# Altium PCB EVB-2.PCBDOC (part 3 of 6)
Units mil, origin at the board's own origin, x right, y up, seen from the top; angles counter-clockwise.
Board outline 2401.57 x 1771.65 mil, 6 copper layers (Top, Mid1-H, Mid2-PWR, GND, Mid3-V, Bottom), stack 59.449 mil thick; 172 components, 166 nets, 823 pads, 550 vias.
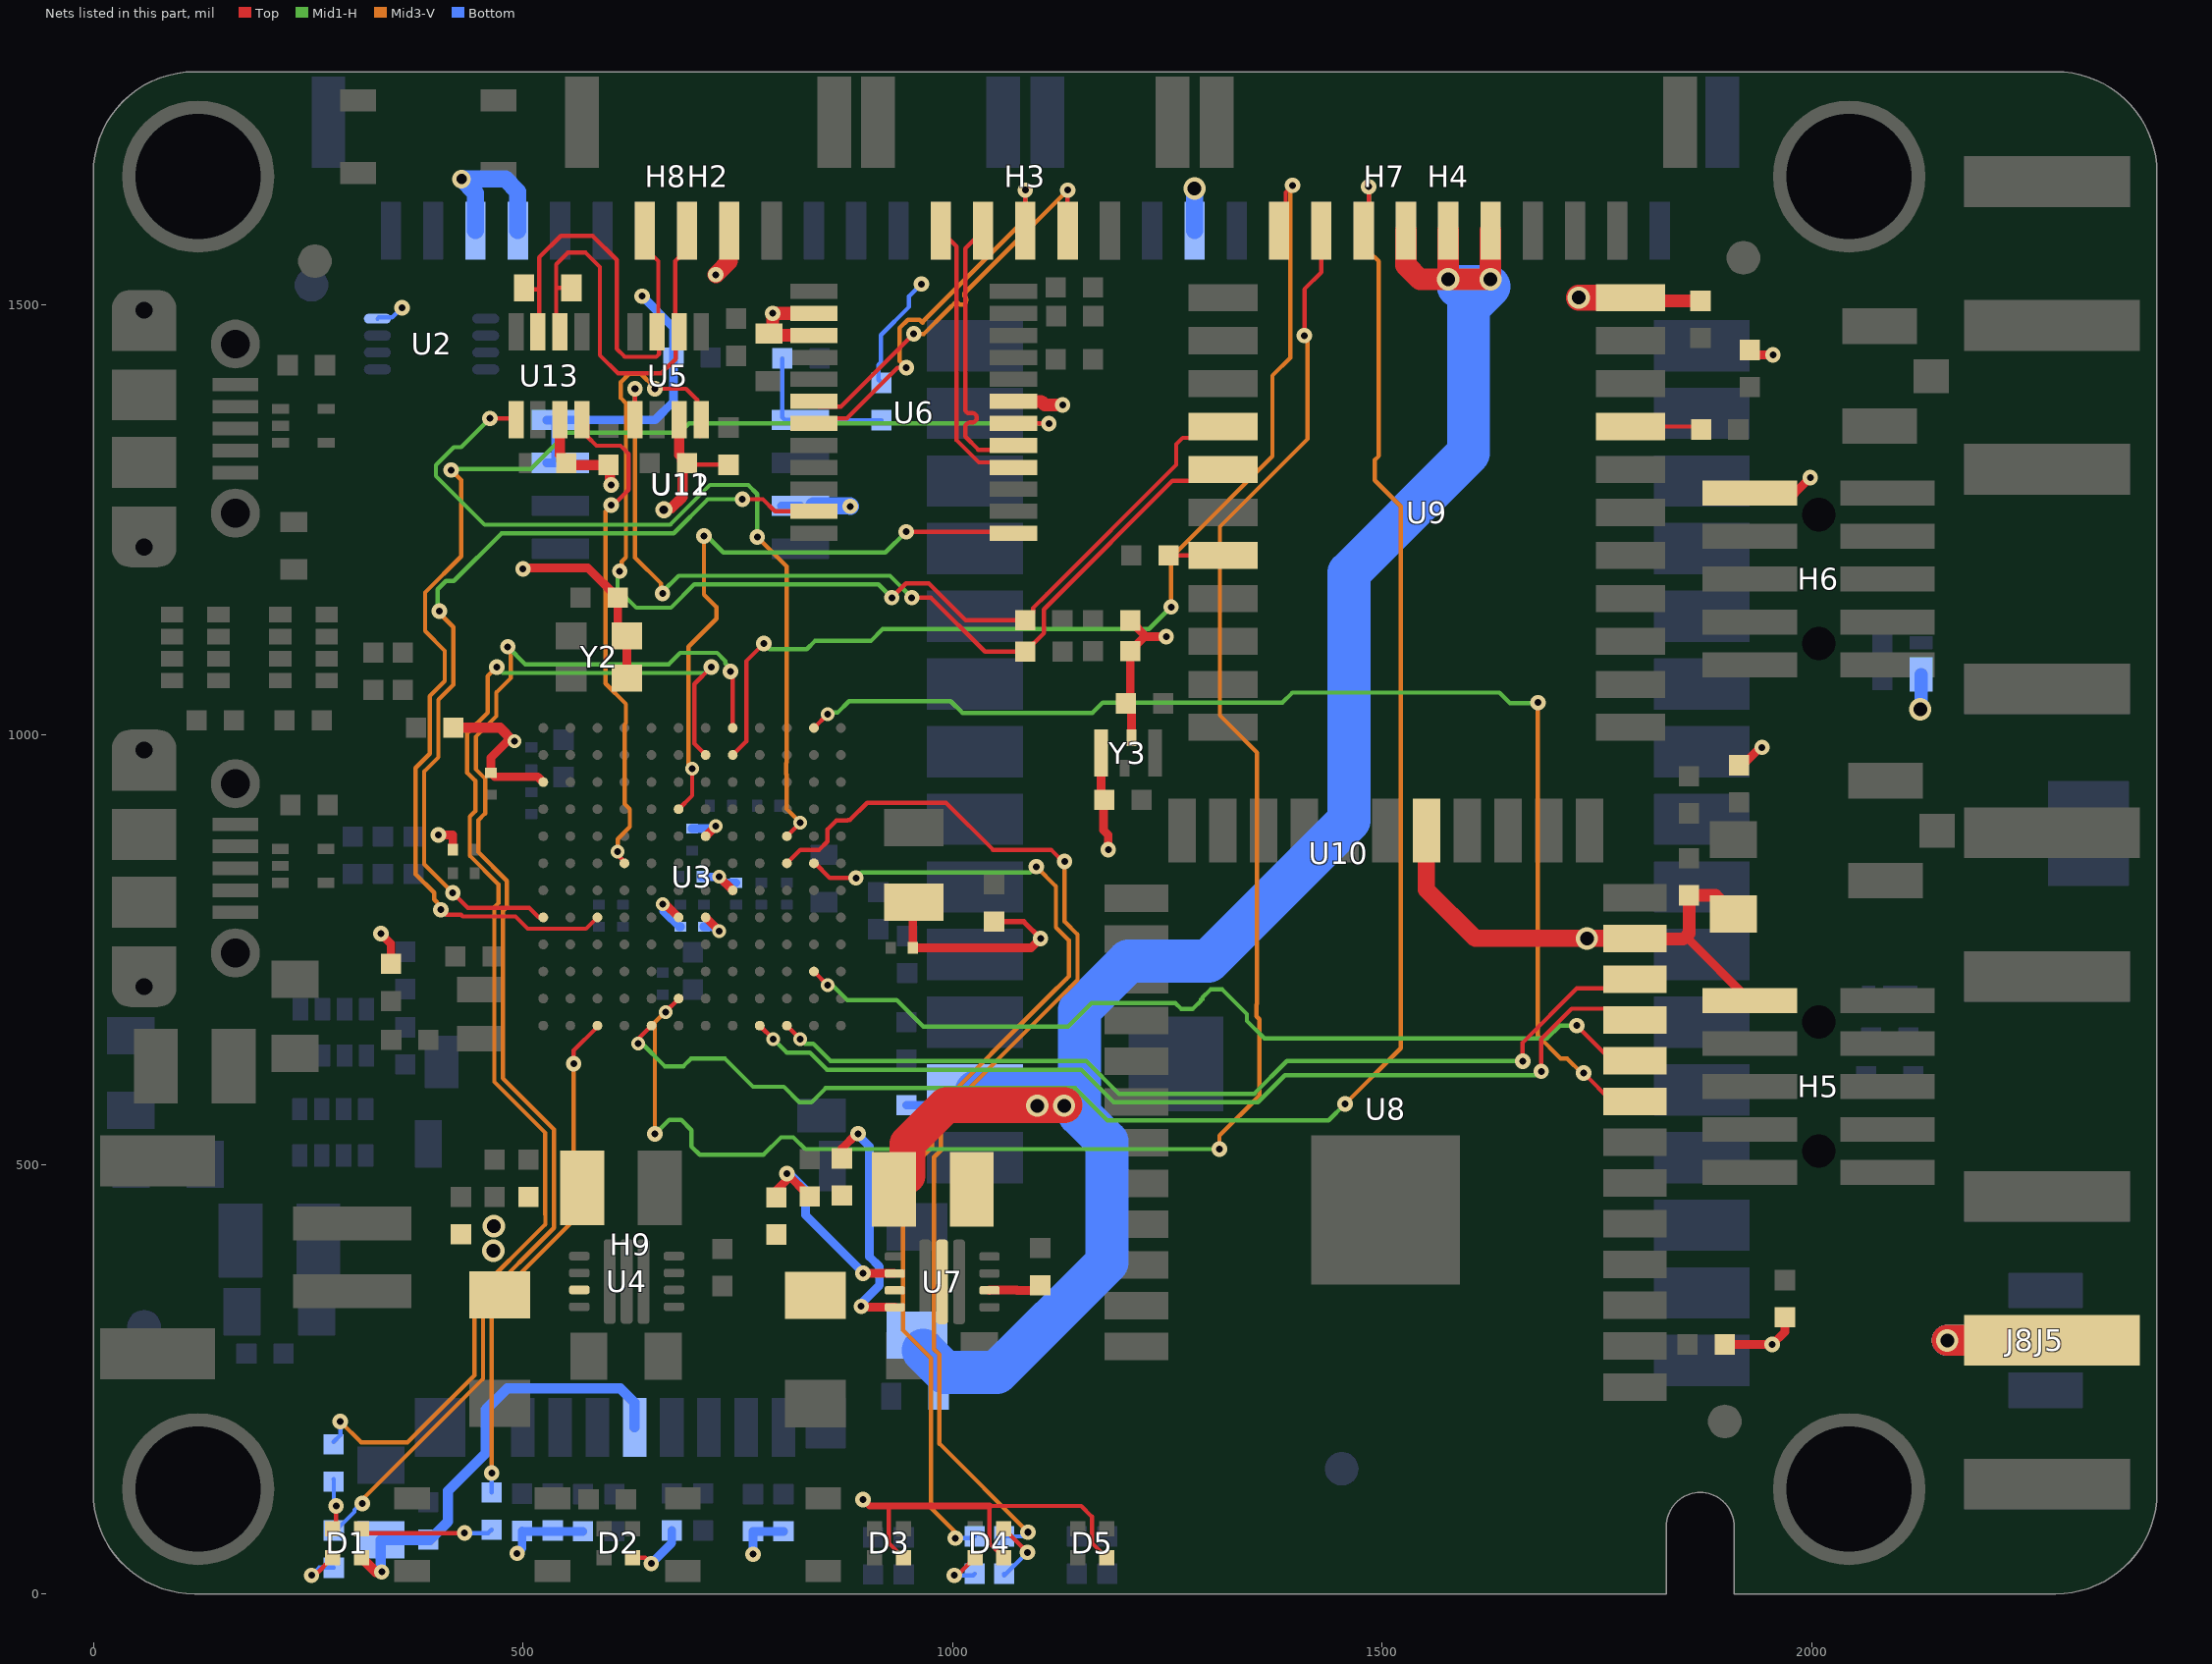
[diagram p6: the nets of this part, all layers, seen from the top]

## Part data (continued)
J3 J4 J8: "CONN UMC RCPT STR 50 OHM SMD", Dielectric Material=-, Frequency - Max=6GHz, Housing Color=Gold, Manufacturer="Emerson Network Power Connectivity Johnson", Manufacturer Part Number=128-0711-201, Operating Temperature="-40°C ~ 90°C", Supplier Part Number 1=J983CT-ND, Voltage Rating=200V, Body Finish=Gold, Body Material=-, Cable Group=-, Category="Connectors, Interconnects", Center Contact Material=-, Center Contact Plating=Gold, ComponentLink1Description=http://media.digikey.com/pdf/Data%20Sheets/Emerson%20PDFs/UMC%20Product%20Catalog.pdf, ComponentLink1URL=http://media.digikey.com/pdf/Data%20Sheets/Emerson%20PDFs/UMC%20Product%20Catalog.pdf, Connector Style="Ultra Miniature Coaxial", Connector Type="Receptacle, Male Pins", Contact Termination=Solder, Fastening Type=Snap-On, Features=-, Impedance="50 Ohm", Ingress Protection=-, Mounting Type="Surface Mount", Packaging="Cut Tape (CT)", Pricing 1="1=0.93, 10=0.832, 50=0.784, 100=0.672, 250=0.576, 500=0.544, 750=0.48, 1000=0.448 (USD)", RoHS="RoHS Compliant", Shield Termination=Solder, Stock 1=1514, Supplier 1=Digi-Key
J5: "CONN RPSMA JCK STR 50OHM EDGEMNT", Case/Package=SMA, Dielectric Material=PTFE, Frequency=18GHz, Housing Colour=Gold, Manufacturer="Amphenol Connex", Manufacturer Part Number=132255RP, Max Operating Temperature=165°C, Min Operating Temperature=-65°C, Package Quantity=1, Supplier Part Number 1=ACX1425-ND, Voltage Rating=375V, Board Thickness=0.062inch, Body Material=Brass, Body Plating=Gold, Connector Type="Coaxial,Male Pin,SMA", Contact Material=Copper, Contact Plating=Gold, Depth=7.92mm, Fastening Type=Threaded, Impedance=50R, Insulation Material=Polytetrafluoroethylene, Length=9.52mm, Mating Cycles=500, Max Frequency=18GHz, Mount=Edge,PCB, Orientation=Straight, Packaging=Bulk, Pricing 1="1=7.75, 10=7.429, 25=6.7832, 50=6.46, 100=6.137, 250=5.491, 500=5.168, 1000=4.522 (USD)", Radiation Hardening=No, REACH SVHC=Unknown, Stock 1=513, Supplier 1=Digi-Key, Termination=Solder, Weight=0.126986oz
J6 J7: "CONN SMA RCPT STR 50OHM EDGE MNT", Case/Package=SMA, Dielectric Material=PTFE, Housing Colour=Gold, Manufacturer=Molex, Manufacturer Part Number=0732511150, Max Frequency=18GHz, Max Operating Temperature=165°C, Min Operating Temperature=-65°C, Package Quantity=1600, Supplier Part Number 1=WM5534-ND, Voltage Rating=500V, Body Material=Brass, Body Plating=Gold, Connector Type=SMA,Socket, Contact Material=Copper, Contact Plating=Gold, Depth=9.53mm, Fastening Type=Threaded, Impedance=50R, Insulation Material=Polytetrafluoroethylene, Lead Free="Lead Free", Length=9.53mm, Mount=Edge, Packaging=Tray, Pricing 1="1=3.33, 10=3.193, 25=2.9272, 50=2.7942, 100=2.6612, 250=2.32856, 500=2.26202, 1600=1.86284, 3200=1.79631 (USD)", Radiation Hardening=No, Stock 1=22842, Supplier 1=Digi-Key, Termination=Solder
MP1 MP2 MP3 MP4: "RND STANDOFF M2.5X0.45 STEEL 5MM", Manufacturer="Wurth Electronics", Manufacturer Part Number=9774050951R, Supplier Part Number 1=732-7098-1-ND, Inside Diameter=0.106inch, Length=0.252inch, Material=Steel, Outside Diameter=0.201inch, Plating=Tin, Pricing 1="1=0.95, 10=0.918, 50=0.795, 100=0.739 (USD)", REACH SVHC=Unknown, Stock 1=2378, Supplier 1=Digi-Key, Threaded/Unthreaded=Unthreaded
Q1 Q2 Q5 Q6: library part MOSFET-Dual-P, "4V DRIVE PCH+PCH MOSFET", Continuous Drain Current (ID)=2.5A, Current Rating=-6A, Drain to Source Breakdown Voltage=-30V, Drain to Source Resistance=84mR, Drain to Source Voltage (Vdss)=30V, Gate to Source Voltage (Vgs)=20V, Manufacturer=Rohm, Manufacturer Part Number=TT8J3TR, Max Operating Temperature=150°C, Max Power Dissipation=1.25W, Min Operating Temperature=-55°C, On-State Resistance=64MR, Package Quantity=3000, Power Dissipation=1.1W, Supplier Part Number 1=TT8J3TRCT-ND, Threshold Voltage=-1.5V, Voltage Rating (DC)=-20V, Element Configuration=Dual, Height=1.1mm, Lead Free="Lead Free", Length=3.1mm, Nominal Vgs=-1.5V, Number of Elements=2, Number of Pins=8, Packaging="Tape and Reel", Pricing 1="1=0.59, 10=0.493, 100=0.3696, 500=0.27102, 1000=0.20942 (USD)", Radiation Hardening=No, Rds On Max=84mR, REACH SVHC="No SVHC", Rise Time=12ns, Stock 1=30988, Supplier 1=Digi-Key, Turn-Off Delay Time=32ns, Turn-On Delay Time=5.5ns, Weight=0.01lb, Width=1.7mm
R1 R2 R8 R14 R23 R38 R39 R44 R45 R48 R49: "RES SMD 100K OHM 1% 1/16W 0402", Case/Package=0402, Case Code (Metric)=1005, Manufacturer=Panasonic, Manufacturer Part Number=ERJ-2RKF1003X, Max Operating Temperature=155°C, Max Power Dissipation=100mW, Min Operating Temperature=-55°C, Package Quantity=1, Resistance=100kR, Supplier Part Number 1=P100KLDKR-ND, Temperature Coefficient=100ppm/°C, Tolerance=1%, Voltage Rating=50V, Case Code (Imperial)=0402, Composition="Thick Film", Contact Plating=Tin, Depth=0.5mm, Features="Automotive AEC-Q200", Height=0.35mm, Lead Free="Lead Free", Length=1mm, Military Standard=Not, Mount="Surface Mount", Number of Pins=2, Number of Terminations=2, Packaging="Tape and Reel", Power Rating=100mW, Pricing 1="1=0.1, 10=0.045, 100=0.0184, 1000=0.00826, 2500=0.00717, 5000=0.00593 (USD)", Radiation Hardening=No, REACH SVHC="No SVHC", Stock 1=6572, Supplier 1=Digi-Key, Termination=SMD/SMT, Voltage Rating (DC)=50V, Width=0.5mm
  R1 R2 R38 R39 R44 R45 R48 R49: ComponentLink1Description=http://www.seielect.com/Catalog/SEI-RMCF_RMCP.pdf, ComponentLink1URL=http://www.seielect.com/Catalog/SEI-RMCF_RMCP.pdf
  R8 R14: ComponentLink1Description=https://datasheet.ciiva.com/2453/pyu-r-int-thick-7-2453361.pdf, ComponentLink1URL=https://datasheet.ciiva.com/2453/pyu-r-int-thick-7-2453361.pdf, ComponentLink2Description=https://datasheet.ciiva.com/2453/pyu-r-int-thick-7-2453362.pdf, ComponentLink2URL=https://datasheet.ciiva.com/2453/pyu-r-int-thick-7-2453362.pdf, ComponentLink3Description=https://datasheet.ciiva.com/2453/pyu-r-int-thick-7-2453363.pdf, ComponentLink3URL=https://datasheet.ciiva.com/2453/pyu-r-int-thick-7-2453363.pdf, ComponentLink4Description=https://datasheet.ciiva.com/22747/1018594-22747509.pdf, ComponentLink4URL=https://datasheet.ciiva.com/22747/1018594-22747509.pdf, ComponentLink5Description=https://datasheet.ciiva.com/15189/getdatasheetpartid-323696-15189334.pdf, ComponentLink5URL=https://datasheet.ciiva.com/15189/getdatasheetpartid-323696-15189334.pdf, ComponentLink6Description=https://datasheet.ciiva.com/16740/pyu-rc0402-51-rohs-l-6-r-16740567.pdf, ComponentLink6URL=https://datasheet.ciiva.com/16740/pyu-rc0402-51-rohs-l-6-r-16740567.pdf, ComponentLink7Description=https://datasheet.ciiva.com/12667/pyu-rc0402-51-rohs-l-6-r-12667930.pdf, ComponentLink7URL=https://datasheet.ciiva.com/12667/pyu-rc0402-51-rohs-l-6-r-12667930.pdf, ComponentLink8Description=https://datasheet.ciiva.com/11819/0900766b80c66297-11819452.pdf, ComponentLink8URL=https://datasheet.ciiva.com/11819/0900766b80c66297-11819452.pdf
R3: "RES SMD 0 OHM JUMPER 1/10W 0603", Case/Package=0603, Case Code (Metric)=1608, Manufacturer=Yageo, Manufacturer Part Number=RC0603JR-070RL, Max Operating Temperature=155°C, Min Operating Temperature=-55°C, Package Quantity=5000, Power Rating=100mW, Resistance=0mR, Supplier Part Number 1=311-0.0GRDKR-ND, Temperature Coefficient=200ppm/°C, Tolerance=1%, Voltage Rating=50V, Case Code (Imperial)=0603, Composition="Thick Film", Contact Plating=Matte,Tin, Depth=0.8mm, Height=0.45mm, Lead Free="Lead Free", Length=1.6mm, Military Standard=Not, Number of Pins=2, Packaging="Tape and Reel", Pricing 1="1=0.1, 10=0.021, 25=0.0152, 50=0.0114, 100=0.0084, 250=0.00644, 500=0.00514, 1000=0.00379 (USD)", Radiation Hardening=No, REACH SVHC="No SVHC", Stock 1=7565242, Supplier 1=Digi-Key, Termination=SMD/SMT, Voltage Rating (DC)=50V, Width=0.8mm
R4: "RES SMD 5.62K OHM 1% 1/10W 0402", Case/Package=0402, Case Code (Metric)=1005, Manufacturer=Panasonic, Manufacturer Part Number=ERJ-2RKF5621X, Max Operating Temperature=155°C, Max Power Dissipation=100mW, Min Operating Temperature=-55°C, Package Quantity=1, Resistance=5.62kR, Supplier Part Number 1=P5.62KLDKR-ND, Temperature Coefficient=100ppm/°C, Tolerance=1%, Voltage Rating=50V, Case Code (Imperial)=0402, Composition="Thick Film", Contact Plating=Tin, Depth=0.5mm, Features="Automotive AEC-Q200", Height=0.016inch, Lead Free="Lead Free", Length=1mm, Military Standard=Not, Mount="Surface Mount", Number of Terminations=2, Packaging="Tape and Reel", Power Rating=100mW, Pricing 1="1=0.1, 10=0.045, 100=0.0184, 1000=0.00826, 2500=0.00717, 5000=0.00593 (USD)", Radiation Hardening=No, REACH SVHC="No SVHC", Stock 1=642946, Supplier 1=Digi-Key, Termination=SMD/SMT, Voltage Rating (DC)=50V, Width=0.02inch
R5 R9 R41 R43: "RES 10K OHM 1/16W 1% 0402 SMD", Case/Package=0402, Case Code (Metric)=1005, Manufacturer=Panasonic, Manufacturer Part Number=ERJ-2RKF1002X, Max Operating Temperature=155°C, Max Power Dissipation=100mW, Min Operating Temperature=-55°C, Package Quantity=1, Resistance=10kR, Supplier Part Number 1=P10.0KLDKR-ND, Temperature Coefficient=100ppm/°C, Tolerance=1%, Voltage Rating=50V, Case Code (Imperial)=0402, Composition="Thick Film", Contact Plating=Tin, Depth=0.5mm, Features="Automotive AEC-Q200", Height=0.35mm, Lead Free="Lead Free", Length=1mm, Military Standard=Not, Mount="Surface Mount", Number of Pins=2, Number of Terminations=2, Packaging="Tape and Reel", Power Rating=100mW, Pricing 1="1=0.1, 10=0.045, 100=0.0184, 1000=0.00826, 2500=0.00717, 5000=0.00593 (USD)", Radiation Hardening=No, REACH SVHC="No SVHC", Stock 1=28312782, Supplier 1=Digi-Key, Termination=SMD/SMT, Voltage Rating (DC)=50V, Width=0.02inch
  R5 R9: ComponentLink1Description=http://www.yageo.com/documents/recent/PYu-RC0402_51_RoHS_L_6.pdf, ComponentLink1URL=http://www.yageo.com/documents/recent/PYu-RC0402_51_RoHS_L_6.pdf, LatestRevisionDate=2-Dec-2009
  R41 R43: ComponentLink1Description=http://industrial.panasonic.com/www-cgi/jvcr13pz.cgi?E+PZ+3+AOA0002+ERJ2RKF1002X+7+WW, ComponentLink1URL=http://industrial.panasonic.com/www-cgi/jvcr13pz.cgi?E+PZ+3+AOA0002+ERJ2RKF1002X+7+WW
R6 R12: "RES SMD 560K OHM 1% 1/10W 0402", Case/Package=0402, Case Code (Metric)=1005, Manufacturer=Panasonic, Manufacturer Part Number=ERJ-2RKF5603X, Max Operating Temperature=155°C, Max Power Dissipation=100mW, Min Operating Temperature=-55°C, Package Quantity=1, Resistance=560kR, Supplier Part Number 1=P560KLDKR-ND, Temperature Coefficient=100ppm/°C, Tolerance=1%, Voltage Rating=50V, Case Code (Imperial)=0402, ComponentLink1Description=https://datasheet.ciiva.com/17204/aoa0000ce2-17204757.pdf, ComponentLink1URL=https://datasheet.ciiva.com/17204/aoa0000ce2-17204757.pdf, ComponentLink2Description=https://datasheet.ciiva.com/6075/aoa0000ce2-6075366.pdf, ComponentLink2URL=https://datasheet.ciiva.com/6075/aoa0000ce2-6075366.pdf, ComponentLink3Description=https://datasheet.ciiva.com/16771/70260748-16771559.pdf, ComponentLink3URL=https://datasheet.ciiva.com/16771/70260748-16771559.pdf, ComponentLink4Description=https://datasheet.ciiva.com/22687/1678782-22687463.pdf, ComponentLink4URL=https://datasheet.ciiva.com/22687/1678782-22687463.pdf, ComponentLink5Description=https://datasheet.ciiva.com/7710/aoa0000ce2-7710746.pdf, ComponentLink5URL=https://datasheet.ciiva.com/7710/aoa0000ce2-7710746.pdf, ComponentLink6Description=https://datasheet.ciiva.com/11821/0900766b80f80784-11821338.pdf, ComponentLink6URL=https://datasheet.ciiva.com/11821/0900766b80f80784-11821338.pdf, ComponentLink7Description=https://datasheet.ciiva.com/24026/aoa0000ce2-24026571.pdf, ComponentLink7URL=https://datasheet.ciiva.com/24026/aoa0000ce2-24026571.pdf, ComponentLink8Description=https://datasheet.ciiva.com/16758/70260748-16758700.pdf, ComponentLink8URL=https://datasheet.ciiva.com/16758/70260748-16758700.pdf, ComponentLink9Description=https://datasheet.ciiva.com/9181/aoa0000ce2-9181118.pdf, ComponentLink9URL=https://datasheet.ciiva.com/9181/aoa0000ce2-9181118.pdf, Composition="Thick Film", Contact Plating=Tin, Depth=0.5mm, Features="Automotive AEC-Q200", Height=0.35mm, Length=1mm, Military Standard=Not, Mount="Surface Mount", Number of Pins=2, Number of Terminations=2, Packaging="Tape and Reel", Power Rating=100mW, Pricing 1="1=0.1, 10=0.056, 100=0.0227, 1000=0.01021, 2500=0.00886, 5000=0.00732 (USD)", Radiation Hardening=No, REACH SVHC="No SVHC", Stock 1=227984, Supplier 1=Digi-Key, Termination=SMD/SMT, Voltage Rating (DC)=50V, Width=0.02inch
R7 R13: "RES SMD 150K OHM 1% 1/10W 0402", Case/Package=0402, Case Code (Metric)=1005, Manufacturer=Panasonic, Manufacturer Part Number=ERJ-2RKF1503X, Max Operating Temperature=155°C, Max Power Dissipation=100mW, Min Operating Temperature=-55°C, Package Quantity=1, Resistance=150kR, Supplier Part Number 1=P150KLDKR-ND, Temperature Coefficient=100ppm/°C, Tolerance=1%, Voltage Rating=50V, Case Code (Imperial)=0402, ComponentLink1Description=https://datasheet.ciiva.com/11821/0900766b80f80784-11821185.pdf, ComponentLink1URL=https://datasheet.ciiva.com/11821/0900766b80f80784-11821185.pdf, ComponentLink2Description=https://datasheet.ciiva.com/7909/426256-7909541.pdf, ComponentLink2URL=https://datasheet.ciiva.com/7909/426256-7909541.pdf, ComponentLink3Description=https://datasheet.ciiva.com/22673/1678782-22673269.pdf, ComponentLink3URL=https://datasheet.ciiva.com/22673/1678782-22673269.pdf, ComponentLink4Description=https://datasheet.ciiva.com/16768/70260748-16768198.pdf, ComponentLink4URL=https://datasheet.ciiva.com/16768/70260748-16768198.pdf, ComponentLink5Description=https://datasheet.ciiva.com/16426/aoa0000ce2-16426743.pdf, ComponentLink5URL=https://datasheet.ciiva.com/16426/aoa0000ce2-16426743.pdf, ComponentLink6Description=https://datasheet.ciiva.com/43467/1678782-43467495.pdf, ComponentLink6URL=https://datasheet.ciiva.com/43467/1678782-43467495.pdf, ComponentLink7Description=https://datasheet.ciiva.com/28547/1678782-28547178.pdf, ComponentLink7URL=https://datasheet.ciiva.com/28547/1678782-28547178.pdf, ComponentLink8Description=https://datasheet.ciiva.com/6137/aoa0000ce2-6137547.pdf, ComponentLink8URL=https://datasheet.ciiva.com/6137/aoa0000ce2-6137547.pdf, ComponentLink9Description=https://datasheet.ciiva.com/7909/aoa0000ce2-7909181.pdf, ComponentLink9URL=https://datasheet.ciiva.com/7909/aoa0000ce2-7909181.pdf, Composition="Thick Film", Contact Plating=Tin, Depth=0.5mm, Features="Automotive AEC-Q200", Height=0.35mm, Lead Free="Lead Free", Length=1mm, Military Standard=Not, Mount="Surface Mount", Number of Pins=2, Number of Terminations=2, Packaging="Tape and Reel", Power Rating=100mW, Pricing 1="1=0.1, 10=0.056, 100=0.0227, 1000=0.01021, 2500=0.00886, 5000=0.00732 (USD)", Radiation Hardening=No, REACH SVHC="No SVHC", Stock 1=322631, Supplier 1=Digi-Key, Termination=SMD/SMT, Voltage Rating (DC)=50V, Weight=2.8E-05oz, Width=0.5mm
R10 R28 R29 R30 R31 R32 R36 R40 R42 R46 R55 R56: "RES SMD 470 OHM 5% 1/16W 0402", Case/Package=0402, Case Code (Metric)=1005, Manufacturer="Vishay Dale", Manufacturer Part Number=CRCW0402470RJNED, Max Operating Temperature=155°C, Max Power Dissipation=63mW, Min Operating Temperature=-55°C, Package Quantity=1, Resistance=470R, Supplier Part Number 1=541-470JDKR-ND, Temperature Coefficient=200ppm/°C, Tolerance=5%, Voltage Rating=50V, Case Code (Imperial)=0402, Composition="Thick Film", Contact Plating=Tin, Depth=0.5mm, Features="Automotive AEC-Q200", Height=0.35mm, Lead Free="Lead Free", Length=1mm, Military Standard=Not, Number of Pins=2, Number of Terminations=2, Packaging="Tape and Reel", Power Rating=63mW, Pricing 1="1=0.1, 10=0.031, 100=0.0125, 1000=0.00563, 2500=0.00488, 5000=0.00403 (USD)", Radiation Hardening=No, REACH SVHC=Unknown, Stock 1=1075, Supplier 1=Digi-Key, Termination=SMD/SMT, Voltage Rating (DC)=50V, Weight=2.3E-05oz, Width=0.02inch
R11: "RES SMD 120 OHM 5% 1/4W 0603", Case/Package=0603, Case Code (Metric)=1608, Manufacturer=Rohm, Manufacturer Part Number=ESR03EZPJ121, Max Operating Temperature=155°C, Max Power Dissipation=250mW, Min Operating Temperature=-55°C, Package Quantity=1, Resistance=120R, Supplier Part Number 1=RHM120DDKR-ND, Temperature Coefficient=200ppm/°C, Tolerance=5%, Case Code (Imperial)=0603, ComponentLink1Description=https://datasheet.ciiva.com/2495/esr-2495284.pdf, ComponentLink1URL=https://datasheet.ciiva.com/2495/esr-2495284.pdf, ComponentLink2Description=https://datasheet.ciiva.com/2495/esr-2495285.pdf, ComponentLink2URL=https://datasheet.ciiva.com/2495/esr-2495285.pdf, ComponentLink3Description=https://datasheet.ciiva.com/2495/esr-2495286.pdf, ComponentLink3URL=https://datasheet.ciiva.com/2495/esr-2495286.pdf, Composition="Thick Film", Height=0.022inch, Lead Free="Lead Free", Length=0.063inch, Number of Terminations=2, Packaging="Tape and Reel", Power Rating=250mW, Pricing 1="1=0.1, 10=0.087, 100=0.0333, 1000=0.01464, 2500=0.01264 (USD)", Stock 1=89476, Supplier 1=Digi-Key, Width=0.031inch
R17 R18 R27 R37 R51: "RES SMD 0 OHM JUMPER 1/16W 0402", Case/Package=0402, Case Code (Metric)=1005, Manufacturer=Yageo, Manufacturer Part Number=RC0402JR-070RL, Max Operating Temperature=155°C, Max Power Dissipation=63mW, Min Operating Temperature=-55°C, Package Quantity=1, Power Rating=62.5mW, Resistance=0mR, Resistance Tolerance="± 5%", Resistor Case Style="0402 [1005 Metric]", Resistor Element Type="Thick Film", Supplier Part Number 1=311-0.0JRDKR-ND, Temperature Coefficient=200ppm/°C, Tolerance=5%, Voltage Rating=50V, Automotive Qualification Standard=-, Case Code (Imperial)=0402, ComponentLink1Description=https://datasheet.ciiva.com/2452/pyu-rc0402-51-rohs-l-6-2452608.pdf, ComponentLink1URL=https://datasheet.ciiva.com/2452/pyu-rc0402-51-rohs-l-6-2452608.pdf, ComponentLink2Description=https://datasheet.ciiva.com/2452/pyu-r-int-thick-7-2452609.pdf, ComponentLink2URL=https://datasheet.ciiva.com/2452/pyu-r-int-thick-7-2452609.pdf, ComponentLink3Description=https://datasheet.ciiva.com/2452/pyu-r-int-thick-7-2452610.pdf, ComponentLink3URL=https://datasheet.ciiva.com/2452/pyu-r-int-thick-7-2452610.pdf, ComponentLink4Description=https://datasheet.ciiva.com/11808/0900766b80c66297-11808195.pdf, ComponentLink4URL=https://datasheet.ciiva.com/11808/0900766b80c66297-11808195.pdf, ComponentLink5Description=https://datasheet.ciiva.com/8896/pyu-rc0402-51-rohs-l-6-8896201.pdf, ComponentLink5URL=https://datasheet.ciiva.com/8896/pyu-rc0402-51-rohs-l-6-8896201.pdf, ComponentLink6Description=https://datasheet.ciiva.com/28386/pyu-rc0402-51-rohs-l-6-28386633.pdf, ComponentLink6URL=https://datasheet.ciiva.com/28386/pyu-rc0402-51-rohs-l-6-28386633.pdf, ComponentLink7Description=https://datasheet.ciiva.com/22747/1018594-22747515.pdf, ComponentLink7URL=https://datasheet.ciiva.com/22747/1018594-22747515.pdf, ComponentLink8Description=https://datasheet.ciiva.com/15189/getdatasheetpartid-326379-15189533.pdf, ComponentLink8URL=https://datasheet.ciiva.com/15189/getdatasheetpartid-326379-15189533.pdf, ComponentLink9Description=https://datasheet.ciiva.com/7983/1018594-7983535.pdf, ComponentLink9URL=https://datasheet.ciiva.com/7983/1018594-7983535.pdf, Composition="Thick Film", Contact Plating=Matte,Tin, Depth=0.5mm, Features="Moisture Resistant", Height=0.016inch, Lead Free="Lead Free", Length=1mm, Military Standard=Not, MSL="MSL 1 - Unlimited", Number of Terminations=2, Packaging="Tape and Reel", Pricing 1="1=0.1, 10=0.017, 25=0.0124, 50=0.0096, 100=0.007, 250=0.00536, 500=0.00428, 1000=0.00315, 5000=0.00226 (USD)", Product Range=-, Radiation Hardening=No, REACH SVHC=Unknown, Stock 1=39749506, Supplier 1=Digi-Key, SVHC="No SVHC (20-Jun-2016)", Termination=SMD/SMT, Width=0.02inch
R19 R20 R35: "RES 10K OHM 1/16W 1% 0402 SMD", Case/Package=0402, Case Code (Metric)=1005, Manufacturer=Panasonic, Manufacturer Part Number=ERJ-2RKF1002X, Max Operating Temperature=155°C, Max Power Dissipation=100mW, Min Operating Temperature=-55°C, Package Quantity=1, Power Rating=62.5mW, Resistance=10kR, Supplier Part Number 1=P10.0KLDKR-ND, Temperature Coefficient=100ppm/°C, Tolerance=1%, Voltage Rating=50V, Case Code (Imperial)=0402, ComponentLink1Description=http://www.yageo.com/documents/recent/PYu-RC0402_51_RoHS_L_6.pdf, ComponentLink1URL=http://www.yageo.com/documents/recent/PYu-RC0402_51_RoHS_L_6.pdf, ComponentLink2Description=https://datasheet.ciiva.com/7660/38568-7660787.pdf, ComponentLink2URL=https://datasheet.ciiva.com/7660/38568-7660787.pdf, ComponentLink3Description=https://datasheet.ciiva.com/11808/0900766b80c66297-11808309.pdf, ComponentLink3URL=https://datasheet.ciiva.com/11808/0900766b80c66297-11808309.pdf, ComponentLink4Description=https://datasheet.ciiva.com/7849/1784430-7849813.pdf, ComponentLink4URL=https://datasheet.ciiva.com/7849/1784430-7849813.pdf, ComponentLink5Description=https://datasheet.ciiva.com/16744/pyu-rc0402-51-rohs-l-6-r-16744005.pdf, ComponentLink5URL=https://datasheet.ciiva.com/16744/pyu-rc0402-51-rohs-l-6-r-16744005.pdf, ComponentLink6Description=https://datasheet.ciiva.com/7849/1686128-7849814.pdf, ComponentLink6URL=https://datasheet.ciiva.com/7849/1686128-7849814.pdf, ComponentLink7Description=https://datasheet.ciiva.com/7849/1784430-7849815.pdf, ComponentLink7URL=https://datasheet.ciiva.com/7849/1784430-7849815.pdf, ComponentLink8Description=https://datasheet.ciiva.com/22747/1018594-22747512.pdf, ComponentLink8URL=https://datasheet.ciiva.com/22747/1018594-22747512.pdf, ComponentLink9Description=https://datasheet.ciiva.com/12667/pyu-rc0402-51-rohs-l-6-r-12667067.pdf, ComponentLink9URL=https://datasheet.ciiva.com/12667/pyu-rc0402-51-rohs-l-6-r-12667067.pdf, ComponentLink10Description=https://datasheet.ciiva.com/7983/1018594-7983486.pdf, ComponentLink10URL=https://datasheet.ciiva.com/7983/1018594-7983486.pdf, Composition="Thick Film", Contact Plating=Tin, Depth=0.5mm, Features="Automotive AEC-Q200", Height=0.35mm, LatestRevisionDate=2-Dec-2009, Lead Free="Lead Free", Lead Pitch=0.2mm, Length=1mm, Military Standard=Not, Mount="Surface Mount", Number of Pins=2, Number of Terminations=2, Packaging="Tape and Reel", Pricing 1="1=0.1, 10=0.045, 100=0.0184, 1000=0.00826, 2500=0.00717, 5000=0.00593 (USD)", Pricing 2="1=0.1, 10=0.018, 100=0.0073, 1000=0.00329, 2500=0.00286, 5000=0.00236 (USD)", Radiation Hardening=No, REACH SVHC="No SVHC", Stock 1=28312782, Stock 2=0, Supplier 1=Digi-Key, Supplier 2=Digi-Key, Supplier Part Number 2=311-10.0KLRDKR-ND, Termination=SMD/SMT, Voltage Rating (DC)=50V, Width=0.5mm, Working Voltage=50V
R21 R24 R33 R34: "RES 470 OHM 1/16W 1% 0402 SMD", Manufacturer="Vishay Dale", Manufacturer Part Number=CRCW0402470RFKED, Package / Case="0402 (1005 Metric)", Power (Watts)="0.063W, 1/16W", Resistance (Ohms)=470, Supplier Part Number 1=541-470LCT-ND, Temperature Coefficient=±100ppm/°C, Tolerance=±1%, Category=Resistors, ComponentLink1Description=http://www.vishay.com/doc?20035, ComponentLink1URL=http://www.vishay.com/doc?20035, Composition="Thick Film", Features="Automotive AEC-Q200 Qualified", Height="0.016\" (0.40mm)", Number of Terminations=2, Packaging="Cut Tape (CT)", Pricing 1="10=0.083, 50=0.0444, 200=0.0255, 1000=0.0174 (USD)", RoHS="RoHS Compliant", Size / Dimension="0.039\" L x 0.020\" W (1.00mm x 0.50mm)", Stock 1=121698, Supplier 1=Digi-Key, Supplier Device Package="0402 (1005 Metric)"
R22: "RES SMD 1M OHM 5% 1/10W 0402", Case/Package=0402, Case Code (Metric)=1005, Manufacturer=Panasonic, Manufacturer Part Number=ERJ-2GEJ105X, Max Operating Temperature=155°C, Max Power Dissipation=100mW, Min Operating Temperature=-55°C, Package Quantity=1, Resistance=1MR, Supplier Part Number 1=P1.0MJDKR-ND, Temperature Coefficient=200ppm/°C, Tolerance=5%, Voltage Rating=50V, Case Code (Imperial)=0402, Composition="Thick Film", Contact Plating=Tin, Depth=0.5mm, Features="Automotive AEC-Q200", Height=0.35mm, Lead Free="Lead Free", Length=1mm, Military Standard=Not, Mount="Surface Mount", Number of Terminations=2, Packaging="Tape and Reel", Power Rating=100mW, Pricing 1="1=0.1, 10=0.031, 100=0.0125, 1000=0.0056, 2500=0.00486, 5000=0.00401 (USD)", Radiation Hardening=No, REACH SVHC="No SVHC", Stock 1=678090, Supplier 1=Digi-Key, Termination=SMD/SMT, Voltage Rating (DC)=50V, Width=0.5mm
R25 R53: "RES 1.00K OHM 1/16W 1% 0402 SMD", Package / Case="0402 (1005 Metric)", Power (Watts)="0.063W, 1/16W", Resistance (Ohms)="NO LOAD", Category=Resistors, ComponentLink1Description=http://www.yageo.com/documents/recent/PYu-RC0402_51_RoHS_L_6.pdf, ComponentLink1URL=http://www.yageo.com/documents/recent/PYu-RC0402_51_RoHS_L_6.pdf, Composition="Thick Film", Features=-, Height="0.016\" (0.40mm)", Number of Terminations=2, Packaging="Cut Tape (CT)", Pricing 1="1=0.1, 10=0.014, 100=0.0063, 500=0.00382, 1000=0.0027, 5000=0.00203 (USD)", RoHS="RoHS Compliant", Size / Dimension="0.039\" L x 0.020\" W (1.00mm x 0.50mm)", Stock 1=3222170
R26 R47: "RES 1.00K OHM 1/16W 1% 0402 SMD", Manufacturer=Yageo, Manufacturer Part Number=RC0402FR-071KL, Package / Case="0402 (1005 Metric)", Power (Watts)="0.063W, 1/16W", Resistance (Ohms)=1k, Supplier Part Number 1=311-1.00KLRCT-ND, Temperature Coefficient=±100ppm/°C, Tolerance=±1%, Category=Resistors, ComponentLink1Description=http://www.yageo.com/documents/recent/PYu-RC0402_51_RoHS_L_6.pdf, ComponentLink1URL=http://www.yageo.com/documents/recent/PYu-RC0402_51_RoHS_L_6.pdf, Composition="Thick Film", Features=-, Height="0.016\" (0.40mm)", LatestRevisionDate=2-Dec-2009, Number of Terminations=2, Packaging="Cut Tape (CT)", Pricing 1="1=0.1, 10=0.014, 100=0.0063, 500=0.00382, 1000=0.0027, 5000=0.00203 (USD)", RoHS="RoHS Compliant", Size / Dimension="0.039\" L x 0.020\" W (1.00mm x 0.50mm)", Stock 1=3222170, Supplier 1=Digi-Key
R54: "RES SMD 1M OHM 1% 1/16W 0402", Case/Package=0402, Case Code (Metric)=1005, Manufacturer=Yageo, Manufacturer Part Number=RC0402FR-071ML, Max Operating Temperature=155°C, Min Operating Temperature=-55°C, Power Rating=63mW, Resistance=1MR, Supplier Part Number 1=311-1.00MLRCT-ND, Temperature Coefficient=100ppm/°C, Tolerance=1%, Voltage Rating=50V, Case Code (Imperial)=0402, ComponentLink1Description=https://datasheet.ciiva.com/11808/0900766b80c66297-11808125.pdf?src-supplier=RSComponents, ComponentLink1URL=https://datasheet.ciiva.com/11808/0900766b80c66297-11808125.pdf?src-supplier=RSComponents, ComponentLink2Description=https://datasheet.ciiva.com/46394/1018594-46394951.pdf?src-supplier=Element14, ComponentLink2URL=https://datasheet.ciiva.com/46394/1018594-46394951.pdf?src-supplier=Element14, ComponentLink3Description=https://datasheet.ciiva.com/16741/pyu-rc0402-51-rohs-l-6-r-16741081.pdf?src-supplier=Future+Electronics, ComponentLink3URL=https://datasheet.ciiva.com/16741/pyu-rc0402-51-rohs-l-6-r-16741081.pdf?src-supplier=Future+Electronics, ComponentLink4Description=https://datasheet.ciiva.com/7849/1018594-7849882.pdf?src-supplier=Element14, ComponentLink4URL=https://datasheet.ciiva.com/7849/1018594-7849882.pdf?src-supplier=Element14, ComponentLink5Description=https://datasheet.ciiva.com/7849/1018594-7849883.pdf?src-supplier=Element14, ComponentLink5URL=https://datasheet.ciiva.com/7849/1018594-7849883.pdf?src-supplier=Element14, Composition="Thick Film", Depth=0.5mm, Height=0.32mm, Lead Free="Lead Free", Length=1mm, Military Standard=Not, Packaging="Tape and Reel", Pricing 1="1=0.10000, 10=0.01600, 100=0.00670, 1000=0.00301, 2500=0.00261, 5000=0.00215 (USD)", REACH SVHC=Unknown, RoHS=Yes, Stock 1=13180955, Supplier 1=Digi-Key, Termination=SMD/SMT
S1 S2 S3: library part "Switch SPST", "SWITCH TACTILE SPST-NO 0.05A 16V", Case/Package=SMD/SMT, Colour=White, Current Rating=50mA, Manufacturer="ITT C&K", Manufacturer Part Number=PTS810SJK250SMTRLFS, Max Operating Temperature=85°C, Min Operating Temperature=-40°C, Operating Force=260gf, Package Quantity=1, Supplier Part Number 1=CKN10503DKR-ND, Voltage Rating (DC)=16V, Actuator Type=Standard, ComponentLink1Description=https://www.ckswitches.com/media/1476/pts810.pdf, ComponentLink1URL=https://www.ckswitches.com/media/1476/pts810.pdf, Contact Plating=Silver, Depth=4.6mm, Illumination Type=Non-Illuminated, Lead Free="Lead Free", Length=3.2mm, Max Current Rating=50mA, Mechanical Life=50000Cycles, Mount="Surface Mount", Orientation=Straight, Packaging="Tape and Reel", Pricing 1="1=0.3, 10=0.287, 25=0.2768, 50=0.267, 100=0.2521, 250=0.23728, 500=0.2274, 1000=0.17302 (USD)", Stock 1=85168, Supplier 1=Digi-Key, Switch Function=Off-Mom, Switch Travel=0.15mm, Termination=J-Bend, Throw Configuration=SPST
U1_I U1_M: "TVS DIODE 5.5V SOT5", Breakdown Voltage=11V, Capacitance=1.5pF, Case/Package=SOT, Clamping Voltage=105.5V, Leakage Current=1nA, Manufacturer="Texas Instruments", Manufacturer Part Number=TPD3E001DRLR, Max Operating Temperature=85°C, Max Supply Current=100nA, Max Supply Voltage=5.5V, Min Operating Temperature=-40°C, Min Supply Voltage=900mV, Package Quantity=1, Peak Pulse Power=90W, Power Line Protection=Yes, Supplier Part Number 1=296-21885-1-ND, Depth=1.2mm, Direction=Unidirectional, Height=0.55mm, Interface=USB, Lead Free="Lead Free", Length=1.6mm, Max Supply Voltage (DC)=5.5V, Min Breakdown Voltage=11V, Min Supply Voltage (DC)=900mV, Nominal Supply Current=1nA, Number of Bidirectional Channels=3, Number of Channels=3, Number of Pins=5, Packaging="Tape and Reel", Pricing 1="1=0.53, 10=0.454, 100=0.3392, 500=0.26648, 1000=0.20592 (USD)", Radiation Hardening=No, REACH SVHC="No SVHC", Reverse Standoff Voltage=5.5V, Stock 1=81393, Supplier 1=Digi-Key, Termination=SMD/SMT, Weight=9.9E-05oz, Width=1.2mm
U2: "IC GATE XOR 2CH 2-INP US8", Case/Package=VSSOP, F @ Nom Voltage(Max)(Mhz)=150, Generic Part Number=SN74LVC2G86, High Level Output Current=-32mA, ICC @ Nom Voltage(Max)(mA)=0.01, Low Level Output Current=32mA, Manufacturer="Texas Instruments", Max Operating Temperature=125°C, Max Supply Voltage=5.5V, Min Operating Temperature=-40°C, Min Supply Voltage=1.65V, Operating Temperature Range(C)="-40 to 125,-40 to 85", Output Current=50mA, Package Quantity=1, Quiescent Current=10uA, Rating=Catalog, Supplier Part Number 1=595-SN74LVC2G86DCUR, tpd @ Nom Voltage(Max)(ns)=11,6.7,5.6,4.2, Voltage(Nom)(V)=1.8,2.5,3.3,5, 3-State Output=No, Bits(#)=2, ComponentLink1Description="Manufacturer URL", ComponentLink1URL=http://www.ti.com/, ComponentLink2Description=Datasheet, ComponentLink2URL=http://www.ti.com/lit/ds/symlink/sn74lvc2g86.pdf, Contact Plating=Gold, DatasheetVersion=SCES360I, Height=0.85mm, Input Type=CMOS/TTL, Lead Free="Lead Free", Length=2.3mm, Logic=True, Logic Function=OR,XOR, Manufacturer Part Number=SN74LVC2G86DCUR, Mount="Surface Mount", Number of Bits=2, Number of Circuits=2, Number of Elements=2, Number of Gates=2, Number of Input Lines=2, Number of Inputs=2, Number of Output Lines=1, Number of Outputs=1, Number of Pins=8, Output Drive (IOL/IOH)(Max)(mA)=32/-32, Output Type=CMOS, PackageReference=DCU0008A, Packaging="Tape and Reel", PartNumber=SN74LVC2G86DCUR, Pricing 1="1=0.55, 10=0.467, 100=0.349, 500=0.27418, 1000=0.21187 (USD)", Pricing 4="1=0.55, 10=0.467, 100=0.349, 500=0.27418, 1000=0.21187 (USD)", Propagation Delay=3.6ns, Radiation Hardening=No, REACH SVHC="No SVHC", Schmitt Trigger=No, Schmitt Trigger Input=No, Stock 1=7530, Stock 4=7530, Sub-Family="XOR Gate", Supplier 1=Mouser, Supplier 2=Digi-Key, Supplier 3=Digi-Key, Supplier 4=Digi-Key, Supplier Part Number 2=296-13275-2-ND, Supplier Part Number 3=296-13275-1-ND, Supplier Part Number 4=296-13275-6-ND, Technology Family=LVC, Turn-On Delay Time=4.7ns, VCC(Max)(V)=5.5, VCC(Min)(V)=1.65, Weight=0.000339oz, Width=2mm
U3: "IC MCU 32BIT 1MB FLASH 144LFBGA", Manufacturer=Microchip, Manufacturer Part Number=ATSAME70Q20B-CNT, Supplier Part Number 1=ATSAME70Q20B-CNTDKR-ND, ComponentLink1Description=Digikey, ComponentLink1URL=https://www.digikey.com/product-detail/en/microchip-technology/ATSAME70Q20B-CNT/ATSAME70Q20B-CNTCT-ND/8275605, Pricing 1="1=12.84, 25=11.6804, 100=10.5782 (USD)", Stock 1=2000, Supplier 1=Digi-Key
U4 U7: "IC REG BUCK ADJ 3.5A 11VQFN", Manufacturer="Texas Instruments", Manufacturer Part Number=TPS62135RGXR, Max Input Voltage=17V, Max Operating Temperature=125°C, Max Output Voltage=12V, Min Input Voltage=3V, Min Operating Temperature=-40°C, Min Output Voltage=800mV, Output Current=3.5A, Quiescent Current=18uA, Supplier Part Number 1=296-47242-6-ND, Switching Frequency=2.5MHz, Lead Free="Lead Free", Mount="Surface Mount", Number of Outputs=1, Number of Pins=11, Packaging="Tape and Reel", Pricing 1="1=2.35, 10=2.113, 100=1.6981, 500=1.39514, 1000=1.15597 (USD)", Stock 1=24851, Supplier 1=Digi-Key, Synchronous Rectifier=Yes
U5 U13: "IC TXRX CAN 3.3V SOT23-8", Manufacturer="Texas Instruments", Manufacturer Part Number=TCAN334DCNR, Max Operating Temperature=125°C, Min Operating Temperature=-40°C, Supplier Part Number 1=296-47830-1-ND, Lead Free="Lead Free", Pricing 1="1=2.6, 10=2.336, 100=1.878, 500=1.54294, 1000=1.27844 (USD)", Stock 1=2931, Supplier 1=Digi-Key
U6: "IC TXRX RS232/485 24TSSOP", Case/Package=TSSOP, Manufacturer=Exar, Manufacturer Part Number=SP330EEY-L, Max Operating Temperature=85°C, Max Supply Voltage=5.5V, Min Operating Temperature=-40°C, Min Supply Voltage=3V, Package Quantity=62, Supplier Part Number 1=1016-1977-ND, Data Rate=20Mbps, Height=1.05mm, Interface=RS-232,RS-422,RS-485, Lead Free="Lead Free", Length=7.9mm, Mount="Surface Mount", Number of Drivers=2, Number of Pins=24, Packaging=Rail/Tube, REACH SVHC=Unknown, Receiver Hysteresis=25mV, Simplex/Duplex="Full Duplex", Stock 1=4132, Supplier 1=Digi-Key, Width=4.5mm
U8: "WIFI/BLE MODULE", Manufacturer=Microchip, Manufacturer Part Number=ATWINC3400-MR210UA122, Supplier Part Number 1=ATWINC3400-MR210UA122-ND, Stock 1=0, Supplier 1=Digi-Key
U9: library part IS-uINS-3.2, "Inertial Sense uINS", Manufacturer="Inertial Sense", Manufacturer Part Number=IS-uINS-3.2-G2, Supplier Part Number 1=IS-uINS-3.2-G1, Supplier 1="Inertial Sense"
U10: "XBEE PRO MOD TXRX ISM 915MHZ UFL", Case/Package=Module, Current - Receiving=40mA, Current - Transmitting=55mA, Frequency=928MHz, Manufacturer="Digi International", Manufacturer Part Number=XBP9X-DMUS-001, Max Operating Temperature=85°C, Min Operating Temperature=-40°C, Supplier Part Number 1=602-1890-ND, Data Rate=250Kbps, Lead Free="Lead Free", Mount="Surface Mount", Packaging=Tray, Pricing 1="1=99, 100=89.0003 (USD)", Sensitivity=-113dBm, Stock 1=681, Supplier 1=Digi-Key
U11: library part W25Q128JV, "IC FLASH 128M SPI 133MHZ 8SOIC", Case/Package=SOIC, Frequency=104MHz, Manufacturer=Winbond, Manufacturer Part Number=W25Q128JVSIQTR, Max Operating Temperature=85°C, Min Operating Temperature=-40°C, Supplier Part Number 1=W25Q128JVSIQCT-ND, Interface=Serial,SPI, Memory Type=FLASH,NOR, Packaging="Tape and Reel", Pricing 1="1=2.2, 10=2.006, 25=1.9528, 50=1.9424, 100=1.7362, 250=1.73108, 500=1.70532, 750=1.67955, 1000=1.63215 (USD)", Stock 1=88262, Supplier 1=Digi-Key
U12: "IC FLASH 1G/2G SPI 8UPDFN", Manufacturer="Micron Technology", Manufacturer Part Number=MT29F2G01ABAGDWB-IT:GTR, Max Operating Temperature=85°C, Min Operating Temperature=-40°C, Supplier Part Number 1=557-1664-6-ND, Interface=Serial,SPI, Memory Type=FLASH,NAND, Pricing 1="1=5.24, 10=4.756, 25=4.6528, 50=4.627, 100=4.1496, 250=4.13412, 500=3.98186, 1000=3.78574 (USD)", Stock 1=7067, Supplier 1=Digi-Key
V1: "VARISTOR 0402", Capacitance=0.5pF, Case/Package=0402, Case Code (Metric)=1005, Clamping Voltage=25V, Current Rating=5nA, Manufacturer=Bourns, Manufacturer Part Number=CG0402MLC-12LG, Max Operating Temperature=85°C, Max Voltage Rating (DC)=12V, Min Operating Temperature=-40°C, Package Quantity=1, Supplier Part Number 1=CG0402MLC-12LGCT-ND, Case Code (Imperial)=0402, Contact Plating=Tin, Depth=0.5mm, Element Configuration=Single, Leakage Current=5nA, Length=1mm, Mount="Surface Mount", Number of Channels=1, Number of Circuits=1, Number of Pins=2, Operating Supply Voltage=12V, Packaging="Tape and Reel", Pricing 1="1=0.44, 10=0.341, 25=0.288, 100=0.2343, 250=0.19416, 500=0.16068, 1000=0.12051, 2500=0.11047, 5000=0.10377 (USD)", Radiation Hardening=No, REACH SVHC="No SVHC", Response Time=1ns, Stock 1=27475, Supplier 1=Digi-Key, Termination=SMD/SMT, Voltage=12V, Voltage Rating=12V, Voltage Rating (DC)=12V, Width=0.5mm, Working Voltage=12V
Y1: "CRYSTAL 32.7680KHZ 9PF SMD", ESR (Equivalent Series Resistance)="90 kOhm", Frequency=32.768kHz, Frequency Stability=-, Frequency Tolerance=±10ppm, Load Capacitance=9pF, Manufacturer="Abracon LLC", Manufacturer Part Number=ABS06-32.768KHZ-9-1-T, Operating Mode=Fundamental, Operating Temperature="-40°C ~ 85°C", Package / Case=2-SMD, Supplier Part Number 1=535-10247-1-ND, Category="Crystals and Oscillators", ComponentLink1Description=http://www.abracon.com/Resonators/ABS06.pdf, ComponentLink1URL=http://www.abracon.com/Resonators/ABS06.pdf, Height="0.024\" (0.60mm)", Mounting Type="Surface Mount", Packaging="Cut Tape (CT)", Pricing 1="1=1.2, 10=1.153, 50=1.1272, 100=0.9639, 500=0.9384, 1000=0.7905 (USD)", Ratings=-, RoHS="RoHS Compliant", Size / Dimension="0.079\" L x 0.047\" W (2.00mm x 1.20mm)", Stock 1=12198, Supplier 1=Digi-Key, Type="kHz Crystal (Tuning Fork)"
Y2: "OSC XO 12.000MHZ HCMOS SMD", Current - Supply (Disable) (Max)=10µA, Current - Supply (Max)=7mA, Frequency=12MHz, Frequency Stability=±10ppm, Manufacturer="ECS Inc.", Manufacturer Part Number=ECS-2520S33-120-FN-TR, Operating Temperature="-40°C ~ 85°C", Package / Case="4-SMD, No Lead (DFN, LCC)", Ratings=-, Supplier Part Number 1=XC2194TR-ND, Voltage - Supply="3.3 V", Category="Crystals and Oscillators", ComponentLink1Description=https://www.ecsxtal.com/store/pdf/ECS-2520S.pdf, ComponentLink1URL=https://www.ecsxtal.com/store/pdf/ECS-2520S.pdf, Function="Standby (Power Down)", Height="0.039\" (1.00mm)", Mounting Type="Surface Mount", Output=HCMOS, Packaging="Tape & Reel (TR)", Pricing 1="1000=0.85, 3000=0.84, 5000=0.81 (USD)", RoHS="RoHS Compliant", Size / Dimension="0.098\" L x 0.079\" W (2.50mm x 2.00mm)", Stock 1=1641, Supplier 1=Digi-Key, Type="XO (Standard)"
Y3: "OSC MEMS 32.768KHZ LVCMOS SMD", Case/Package=SMD/SMT, Current Rating=1.35uA, Frequency=32.768kHz, Frequency Stability=100ppm, Load Capacitance=10pF, Manufacturer=SiTime, Manufacturer Part Number=SIT1533AI-H4-DCC-32.768E, Max Operating Temperature=85°C, Max Supply Current=1.4uA, Max Supply Voltage=3.63V, Min Operating Temperature=-40°C, Min Supply Voltage=1.5V, Package Quantity=1000, Supplier Part Number 1=1473-1239-1-ND, Height=0.024inch, Length=0.079inch, Max Duty Cycle=52%, Mount="Surface Mount", Number of Pins=4, Packaging="Tape and Reel", Pricing 1="1=1.21, 10=1.072, 50=1.0018, 100=0.8852, 500=0.83866 (USD)", Pricing 2="1=1.21, 10=1.072, 50=1.0018, 100=0.8852, 500=0.83866 (USD)", Stock 1=127563, Stock 2=135399, Supplier 1=Digi-Key, Supplier 2=Digi-Key, Supplier Part Number 2=1473-1239-6-ND, Termination=SMD/SMT, Width=0.047inch

## Free pads (board coordinates)
  round 39.37 smd far side mask+25: 0(59.06,311.02) 0(253.94,1523.62) 0(1452.76,145.67)
  round 39.37 smd mask+25: 0(257.87,1551.18) 0(1898.62,200.79) 0(1920.28,1555.12)

## Via types
v1: diameter 18, hole 8, Top to Bottom, 385 vias
v2: diameter 16, hole 8, Top to Bottom, 100 vias
v3: diameter 26, hole 16, Top to Bottom, 58 vias
v4: diameter 22, hole 12, Top to Bottom, 3 vias
v5: diameter 20, hole 10, Top to Bottom, 2 vias
v6: diameter 18, hole 8.27, Top to Bottom, 2 vias

## Nets (pads, with @x,y where several pads share a name; then routed paths per layer and width w, separated by ;. In a path a pad name is that pad's centre, name@x,y a point inside that pad or via, vN(x,y) a via of type N, cw(c..) or ccw(c..) an arc to the next point about the centre after c; other vN are vias at no path point)
232Rx/485Rx+: H3.5 U6.16 | length 330.7
  Top w5: H3.5@986.22,1586.61 1004.76,1568.07 1004.76,1342.68 1030.51,1316.93 1065.17,1316.93 U6.16@1070.87,1311.23
232Tx/485Tx-: H3.2 U6.6 | length 483.1
  Top w5: U6.6@838.58,1388 844.69,1381.89 870.08,1381.89 v1(954.72,1466.53) ; H3.2@1133.86,1562.99 H3.2@1133.86,1586.61 v1(1133.86,1633.86)
  Mid3-V w5: v1(954.72,1466.53) 966.53,1466.53 992.62,1492.62 996.51,1496.51 1001.97,1501.97 cw(c1004.29,1499.66) 1006.61,1501.97 ccw(c1010.49,1505.86) 1014.38,1501.97 ccw(c1010.49,1505.86) 1014.38,1509.75 cw(c1016.7,1512.07) 1014.38,1514.38 1040.5,1540.5 v1(1133.86,1633.86)
485-RX-EN: U3.H3 U6.18 | length 1525.7
  Top w5: v1(404.55,796.3) 410.38,790.47 427.96,790.47 429.97,788.46 491.29,788.46 505.56,774.19 573.41,774.19 U3.H3@586.61,787.4 ; U6.18@1070.87,1362.41 1111.79,1362.41 v1(1111.99,1362.2)
  Mid1-H w5: v1(416.39,1308.02) 417.42,1309.06 508.59,1309.06 550.91,1351.38 682.45,1351.38 693.27,1362.2 v1(1111.99,1362.2)
  Mid3-V w5: v1(404.55,796.3) 404.55,800.18 396.6,808.13 396.6,816.13 375.07,837.66 375.07,961.32 391.64,977.89 391.64,1044.92 409.03,1062.32 409.03,1097.64 386.08,1120.6 386.08,1165.61 428.08,1207.61 428.08,1296.33 v1(416.39,1308.02)
485/2\3\2\-SEL: U3.D6 U6.13 | length 724.7
  Top w5: U3.D6@681.1,913.39 696.85,929.13 v2@696.85,957.01 ; v1(945.87,1236.22) 1069.1,1236.22 U6.13@1070.87,1234.46
  Mid1-H w5: v1(710.59,1231.3) 714.11,1231.3 719.02,1226.39 733.31,1212.1 921.75,1212.1 v1(945.87,1236.22)
  Mid3-V w5: v2@696.85,957.01 692.61,961.25 692.61,1102.35 725.16,1134.9 725.16,1148.56 710.59,1163.13 v1(710.59,1231.3)
  other v2: 696.85,960.63
485Rx-: H3.4 U6.17 | length 330.6
  Top w5: H3.4@1035.43,1586.61 1014.76,1565.94 1014.76,1378.94 ccw(c1019.38,1378.94) 1019.38,1374.32 1022.68,1374.32 cw(c1022.68,1368.82) 1028.18,1368.82 cw(c1022.68,1368.82) 1022.68,1363.32 1020.26,1363.32 ccw(c1020.26,1357.82) 1014.76,1357.82 1014.76,1352.32 1014.76,1346.82 1029.89,1331.69 1065.74,1331.69 U6.17@1070.87,1336.82
485Tx+: H3.3 U6.7 | length 467.6
  Top w5: U6.7@838.58,1362.41 844.28,1368.11 876.97,1368.11 936.02,1427.17 v1(946.17,1427.17) ; H3.3@1084.65,1586.61 v1(1084.65,1633.86)
  Mid3-V w5: v1(946.17,1427.17) 938.22,1435.12 938.22,1473.37 947.89,1483.03 961.56,1483.03 965.22,1479.37 965.22,1480.53 1084.65,1599.95 v1(1084.65,1633.86)
+3.3V: C5.2 C9.2 C10.1 C11.1 C13.2 C14.2 C17.1 C19.1 C25.2 C26.2 C27.2 C28.2 C29.1 C30.2 C39.1 C41.2 C42.1 C43.1 C45.1 C46.1 C51.2 C52.1 C57.2 D1.1 D2.1 D3.1 D4.1 D5.1 D6.A H2.2 H5.1 H6.1 H7.3 H8.3 H8.4 H9.4 I2.2 I3.2 I5.2 R6.2 R8.2 R9.2 R19.2 R20.2 R22.2 R25.2 R27.2 R35.2 R38.1 R39.1 R41.1 R43.1 R44.1 R45.1 R51.2 R53.2 U2.8 U3.C1 U3.E7 U3.G8 U3.H6 U3.H7 U4.6 U5.3 U6.2 U6.3 U6.19 U8.12 U8.18 U9.22 U11.3 U11.7 U11.8 U12.3 U12.7 U12.8 U13.3 Y2.1 Y2.4 Y3.1 Y3.4 | length 4876.1
  Top w5: C10.1@463.2,347.94 C10.1@469.86,354.59 ; U4.6@564.81,354.59 U4.6@565.57,353.84 ; D2.1@627.57,42.32 642.34,42.32 v1(649.23,35.43) ; C14.2@690.94,1314.18 R27.2@739.17,1314.18 ; 925.53,102.36 925.53,59.43 D3.1@942.63,42.32 ; D4.1@1059.66,42.32 1042.93,59.05 1042.93,102.36 1149.61,102.36 1162.03,89.94 1162.03,59.43 D5.1@1179.13,42.32
  Top w6: R53.2@1048.34,782.49 1082.69,782.49 v1(1102.36,762.82)
  Top w8: v1(895.66,109.71) 903.01,102.36 925.53,102.36 1042.93,102.36
  Top w10: v1(334.65,768.4) 346.46,756.59 C5.2@346.46,733.27 ; v1(401.57,883.5) 418.3,883.5 I2.2@418.3,866.27 ; C11.1@460.87,956.61 462.63,956.61 462.63,973.37 481.54,992.28 ; C11.1@462.6,955.71 467.2,951.12 517.39,951.12 U3.C1@523.62,944.88 ; v1(500,1192.91) 501.28,1194.19 575.49,1194.19 C13.2@610.24,1159.45 Y2.1@610.24,1125.98 ; Y2.4@621.06,1065.94 Y2.1@621.06,1115.16 ; v2@665.35,803.15 U3.H6@681.1,787.4 ; U3.H7@712.6,787.4 v2(728.35,771.65) ; U3.E7@712.6,881.89 v2@722.93,892.23 ; v2(728.35,834.65) U3.G8@744.09,818.9 ; I5.2@954.72,805.12 953.74,804.14 C19.1@953.74,751.97 1091.51,751.97 v1(1102.36,762.82) ; Y3.1@1172.7,978.63 1172.7,928.01 C25.2@1176.5,924.21 1175.62,923.34 1175.62,888.91 1181.1,883.42 v1(1181.1,866.14) ; C26.2@1198.89,1032.48 C26.2@1206.69,1032.48 ; R19.2@1206.69,1132.62 1225.14,1114.17 ; Y3.4@1208.13,996.34 1208.13,1032.48 C26.2@1206.69,1032.48 ; v1(1248.62,1114.17) 1225.14,1114.17 ; 1850.39,762.18 1856.25,762.18 H5.1@1927.87,690.55 ; R22.2@1898.62,290.35 v1(1953.74,290.35) 1968.5,305.12 R9.2@1968.5,321.9 ; C30.2@1915.35,964.57 1919.29,964.57 v1@1940.94,986.22 ; H6.1@1927.87,1281.1 1979.92,1281.1 v1(1998.03,1299.21) ; R25.2@1927.87,1450.79 1936.73,1441.93 v1(1954.72,1441.93) ; C26.2@1206.69,1032.48 R20.2@1206.69,1097.12 1206.69,1097.44 1223.42,1114.17 1225.14,1114.17
  Top w12: D1.1@312.01,42.32 328.74,25.59 v1(335.63,25.59) ; C9.2@418.97,1008.09 473.04,1008.09 488.85,992.28 v2(489.94,992.28) ; U13.3@543.09,1364.11 543.09,1325.83 544.52,1324.4 544.52,1318.8 550.33,1312.99 550.92,1313.59 598.96,1313.59 R51.2@599.55,1314.18 601.41,1312.33 601.41,1291.84 v1(602.55,1290.69) ; Y2.1@610.24,1125.98 Y2.1@621.06,1115.16 ; v5(663.85,1261.91) 665.26,1263.32 672.38,1263.32 685.5,1276.43 685.5,1313.35 688.04,1315.9 685.13,1318.8 685.13,1322.33 681.63,1325.83 U5.3@681.63,1366.6
  Top w15: C17.1@786.42,1466.74 790.52,1470.85 v1(790.52,1490.36) U6.2@838.58,1490.36 ; C17.1@791.34,1464.77 U6.3@838.58,1464.77 ; U6.19@1070.87,1388 1103.14,1388 1107.44,1383.7 1127.8,1383.7 v1(1127.95,1383.86) ; U8.12@1794.58,762.18 1850.39,762.18 1857.05,768.83 C27.2@1857.05,812.99 1887.8,812.99 C29.1@1908.46,792.32 ; U9.22@1797.68,1504.92 C28.2@1870.39,1504.92
  Top w20: v1(724.41,1535.43) 740.16,1551.18 H2.2@740.16,1586.61 ; U8.18@1551.34,888.35 1551.34,819.76 1608.28,762.82 v3(1738.19,762.82) U8.12@1793.94,762.82 U8.12@1794.58,762.18 ; U9.22@1793.94,1508.66 U9.22@1797.68,1504.92
  Top w30: v3(1728.67,1508.76) 1793.84,1508.76 U9.22@1793.94,1508.66
  Bottom w5: U2.8@330.71,1484.25 332.01,1485.56 347.69,1485.56 v1(359.17,1497.03) ; R35.2@917.32,1409.45 913.65,1413.12 913.65,1430.48 916.51,1433.35 916.51,1465.28 949.32,1498.09 949.32,1510.35 v1(963.58,1524.61)
  Bottom w10: v1(493.13,47.24) 499.02,53.13 R45.1@499.02,73.35 499.53,72.83 R43.1@569.88,72.83 ; U11.7@527.95,1316.34 U11.7@543.31,1316.34 537.94,1321.71 537.94,1362.87 534.67,1366.14 U12.8@527.95,1366.14 ; U11.8@543.31,1366.34 653.74,1366.34 675.2,1387.8 C41.2@675.2,1437.01 ; v1(638.78,1510.35) 675.2,1473.93 C41.2@675.2,1438.98 ; v1(649.23,35.43) 673.23,59.43 R41.1@673.23,73.82 ; v2(662.65,802.9) 663.8,801.75 663.8,794.5 672.03,786.27 672.37,786.27 682.07,776.57 C46.1@683.07,776.57 ; C45.1@696.85,890.75 721.46,890.75 v2(724.41,893.7) ; C43.1@707.68,834.65 v2(728.35,834.65) 735.23,827.76 C39.1@748.03,827.76 ; C42.1@710.63,776.57 723.43,776.57 v2(728.35,771.65) ; v1(767.72,46.26) R39.1@767.72,72.83 R38.1@803.15,72.83 ; U11.3@800.79,1266.34 U11.3@822.83,1266.34 ; v3@2126.97,1037.4 v3@2127.05,1037.48
  Bottom w12: v1(335.63,25.59) 334.65,26.57 C52.1@334.65,62.99 391.73,62.99 412.89,84.15 412.89,120 456.69,163.8 456.69,214.38 481.66,239.35 613.02,239.35 629.92,222.44 H9.4@629.92,193.9
  Bottom w15: v3@2127.05,1037.48 D6.A@2127.05,1070.13
  Bottom w20: H8.3@444.88,1586.61 444.88,1630.24 v4(428.47,1646.65) 479.33,1646.65 494.09,1631.89 H8.4@494.09,1586.61 ; U12.3@838.58,1266.14 880.51,1266.14 v1(880.91,1265.75) ; H7.3@1281.5,1586.61 v3(1281.5,1635.83)
  other v1: 1941.93,985.24
  other v3: 465.57,399.63 466.16,428.15 2125.98,1029.53
\SP330-SHDN: U3.H1 U6.11 | length 995
  Top w5: v1(418.33,815.98) 435.85,798.46 507.28,798.46 518.34,787.4 U3.H1@523.62,787.4 ; v1(755.43,1274.1) 779.21,1274.1 793.26,1260.05 U6.11@838.58,1260.05
  Mid1-H w5: v1(402.58,1143.76) 402.58,1145.22 405.3,1147.94 400.82,1152.42 400.82,1169.24 410.49,1178.9 419.68,1178.9 475.19,1234.41 675.44,1234.41 715.13,1274.1 v1(755.43,1274.1)
  Mid3-V w5: v1(402.58,1143.76) 402.58,1141.71 406.46,1137.83 419.03,1125.26 419.03,1058.17 401.64,1040.78 401.64,973.75 385.07,957.18 385.07,910.8 385.07,849.25 v1(418.33,815.98)
Bee-LED.Rx: R30.2 U3.F10 | length 1323.1
  Top w5: U3.F10@807.09,850.39 822.83,866.14 844.78,866.14 854.33,875.69 854.33,889.76 864.74,900.18 877.59,900.18 878.22,900.81 880.41,900.81 900.48,920.89 992.28,920.89 1047.02,866.14 1114.62,866.14 1130.29,850.48 v1(1130.29,852.63)
  Mid3-V w5: v1(1087.72,71.85) 984.72,174.85 984.72,278.53 978.35,284.9 978.35,508.32 986.17,516.15 986.17,555.51 1122.66,692 1136.45,705.79 1145.33,714.67 1145.33,767.5 1130.44,782.39 1130.44,852.48 v1(1130.29,852.63)
  Bottom w5: R30.2@1060.04,66.93 1082.79,66.93 v1(1087.72,71.85)
Bee-LED.Tx: R31.2 U3.F11 | length 1198.1
  Top w5: U3.F11@838.58,850.39 839.91,850.39 856.99,833.31 v1(887.57,833.31)
  Mid1-H w5: v1(887.57,833.31) 893.75,839.49 1090.33,839.49 v1(1097.29,846.45)
  Mid3-V w5: v1(1003.07,64.96) 1003.07,71.73 974.72,100.08 974.72,274.38 942.17,306.94 942.17,486.29 976.17,520.29 976.17,559.66 1112.66,696.14 1132.31,715.79 1135.33,718.81 1135.33,760.65 1120.29,775.69 1120.29,823.46 v1(1097.29,846.45)
  Bottom w5: v1(1003.07,64.96) 1021.88,64.96 1024.83,67.91 R31.2@1025.82,66.93
BEE.3V3: C18.1 C31.1 C32.1 C33.1 H4.4 H4.5 H4.6 I4.2 R12.2 R14.2 U7.6 U10.2 | length 2426.8
  Top w25: H4.6@1527.56,1586.61 1527.56,1546.26 1543.92,1529.9 v3(1625.99,1529.9) ; v3@1576.77,1529.99 H4.5@1576.77,1586.61 ; v3@1625.98,1531.96 H4.4@1625.98,1586.61
  Top w40: I4.2@931.71,470.96 I4.2@947.38,486.64
  Top w42: I4.2@947.38,486.64 947.38,524.15 992.12,568.9 v3@1129.92,568.9
  Bottom w10: C32.1@946.17,568.9 1025.82,568.9 U10.2@1025.82,586.61
  Bottom w40: U10.2@1025.82,586.61 U10.2@1027.79,584.64
  Bottom w50: C33.1@965.64,283.46 991.23,257.87 1051.43,257.87 1179.5,385.95 1179.5,526.23 1147.64,558.09 1147.64,679.38 1204.84,736.59 1297.61,736.59 1461.24,900.22 1461.24,1188.61 1600.39,1327.76 1600.39,1498.03 1624.02,1521.65 1588.35,1521.65 ; U10.2@1027.79,584.64 1030.25,582.19 1122.05,582.19
  other v3: 1098.43,568.2 1129.7,568.2 1576.68,1529.9
BEE.FB: R12.1 R13.2 U7.5 | length 262.1
  Top w5: R13.2@832.68,463.58 832.68,461.61 R13.2@833.67,462.6